# Altium PCB Controller-PCB.PcbDoc
Units mm, origin at the board's own origin, x right, y up, seen from the top; angles counter-clockwise.
Board outline 60 x 40.08 mm, 2 copper layers (Top Layer, Bottom Layer); 4 components, 11 nets, 53 pads, 0 vias.
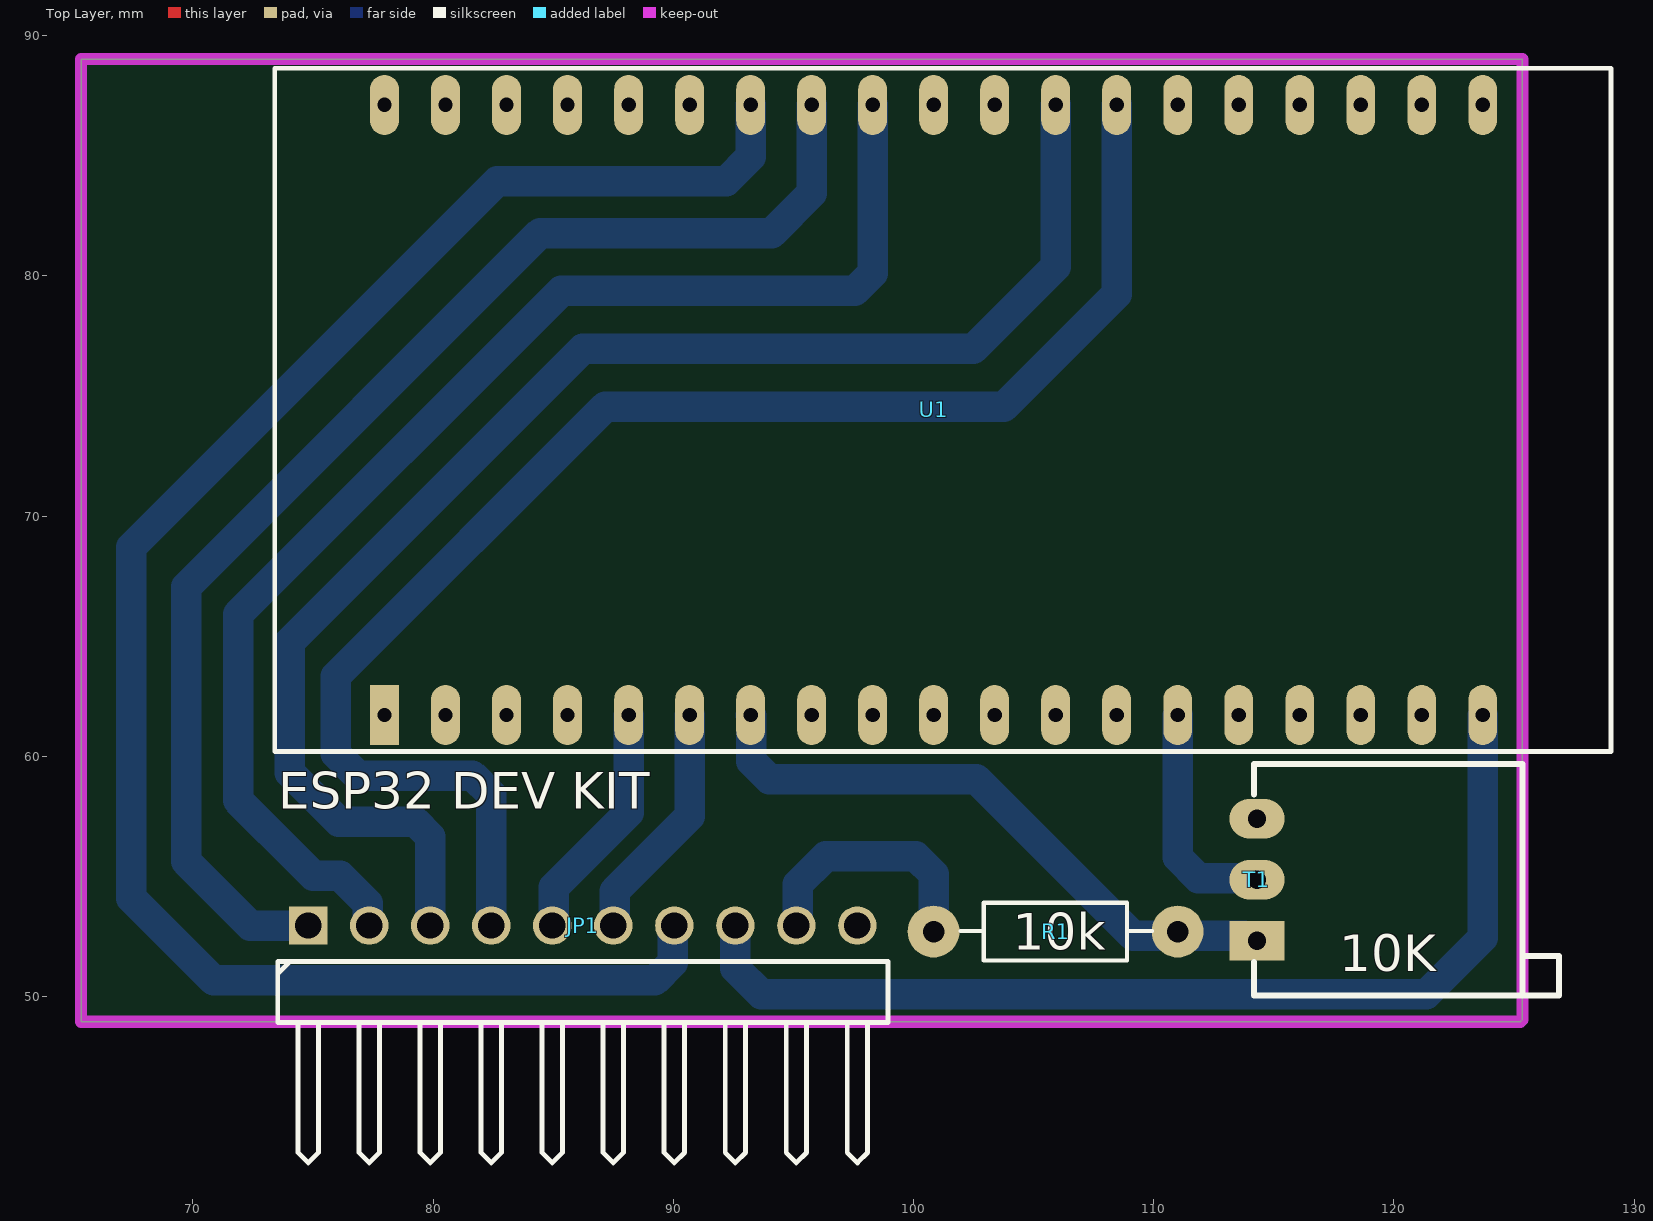
[diagram p0: Top Layer view]
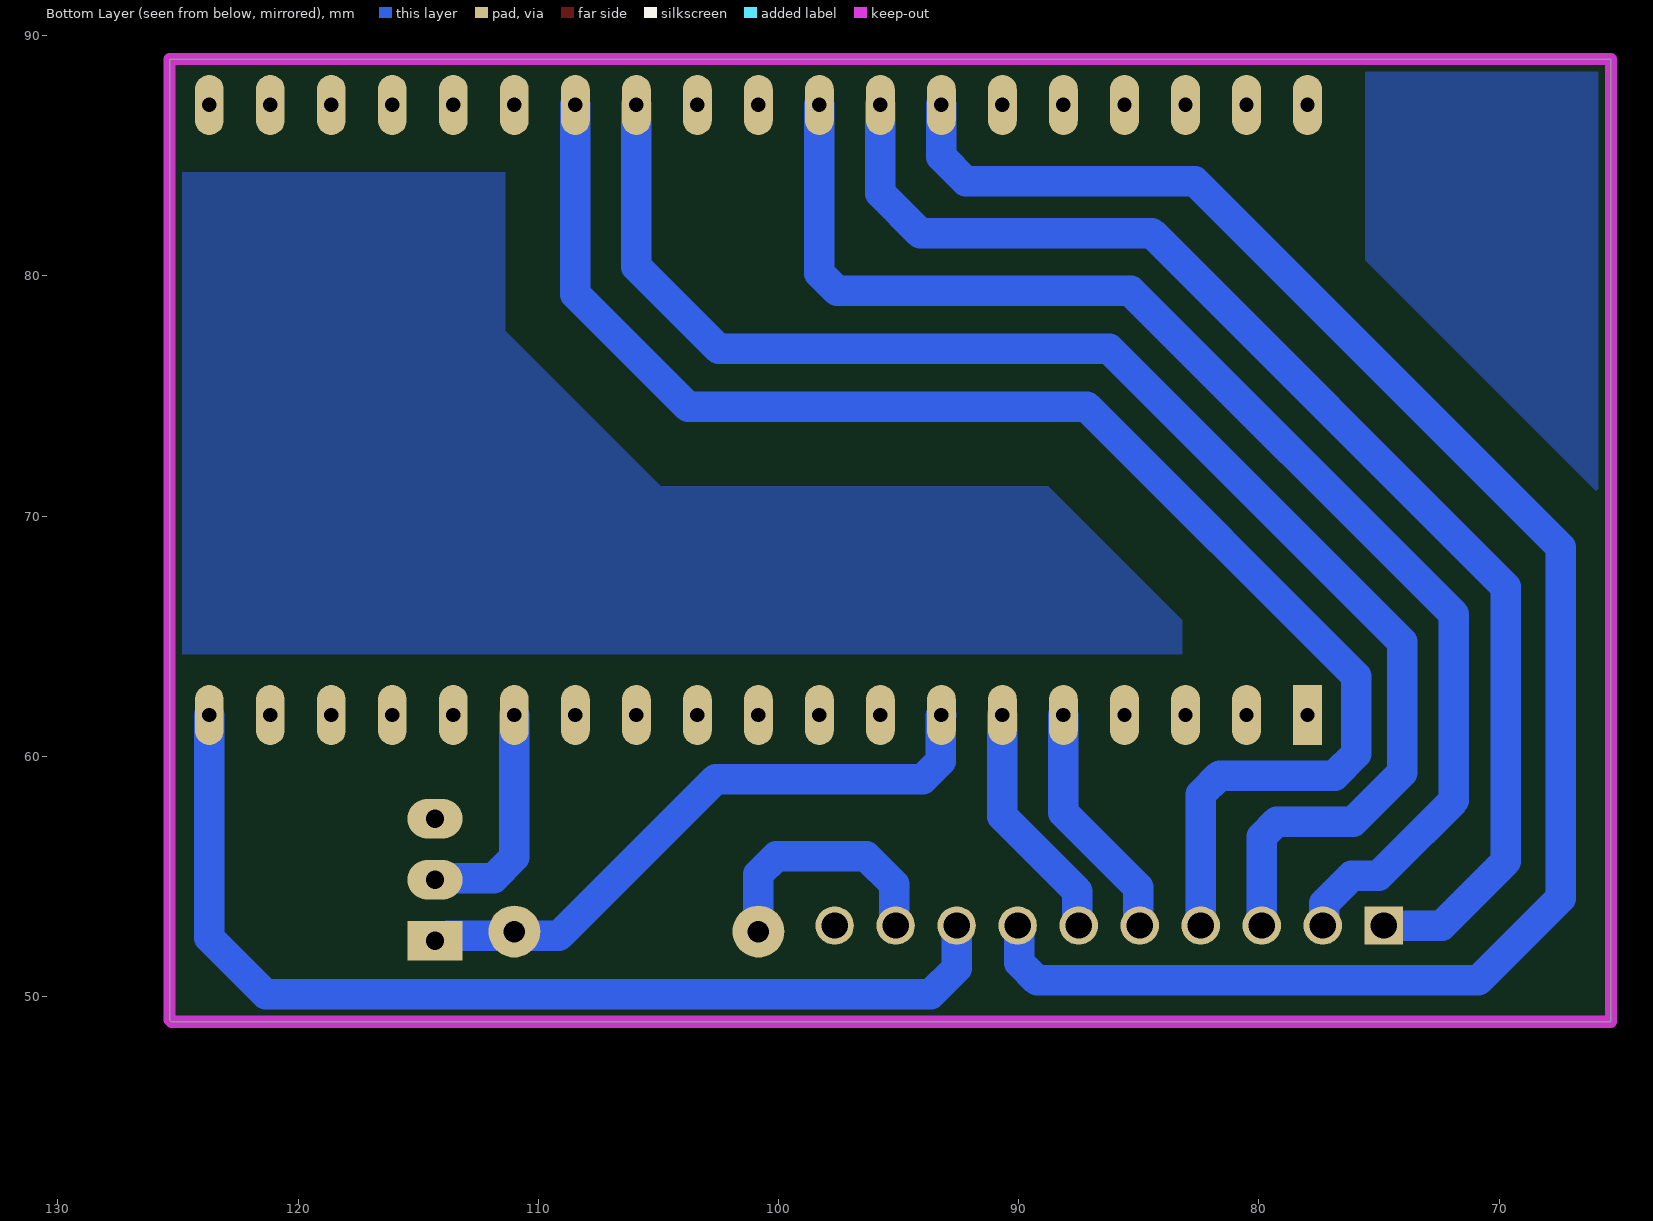
[diagram p1: Bottom Layer view, seen from below]
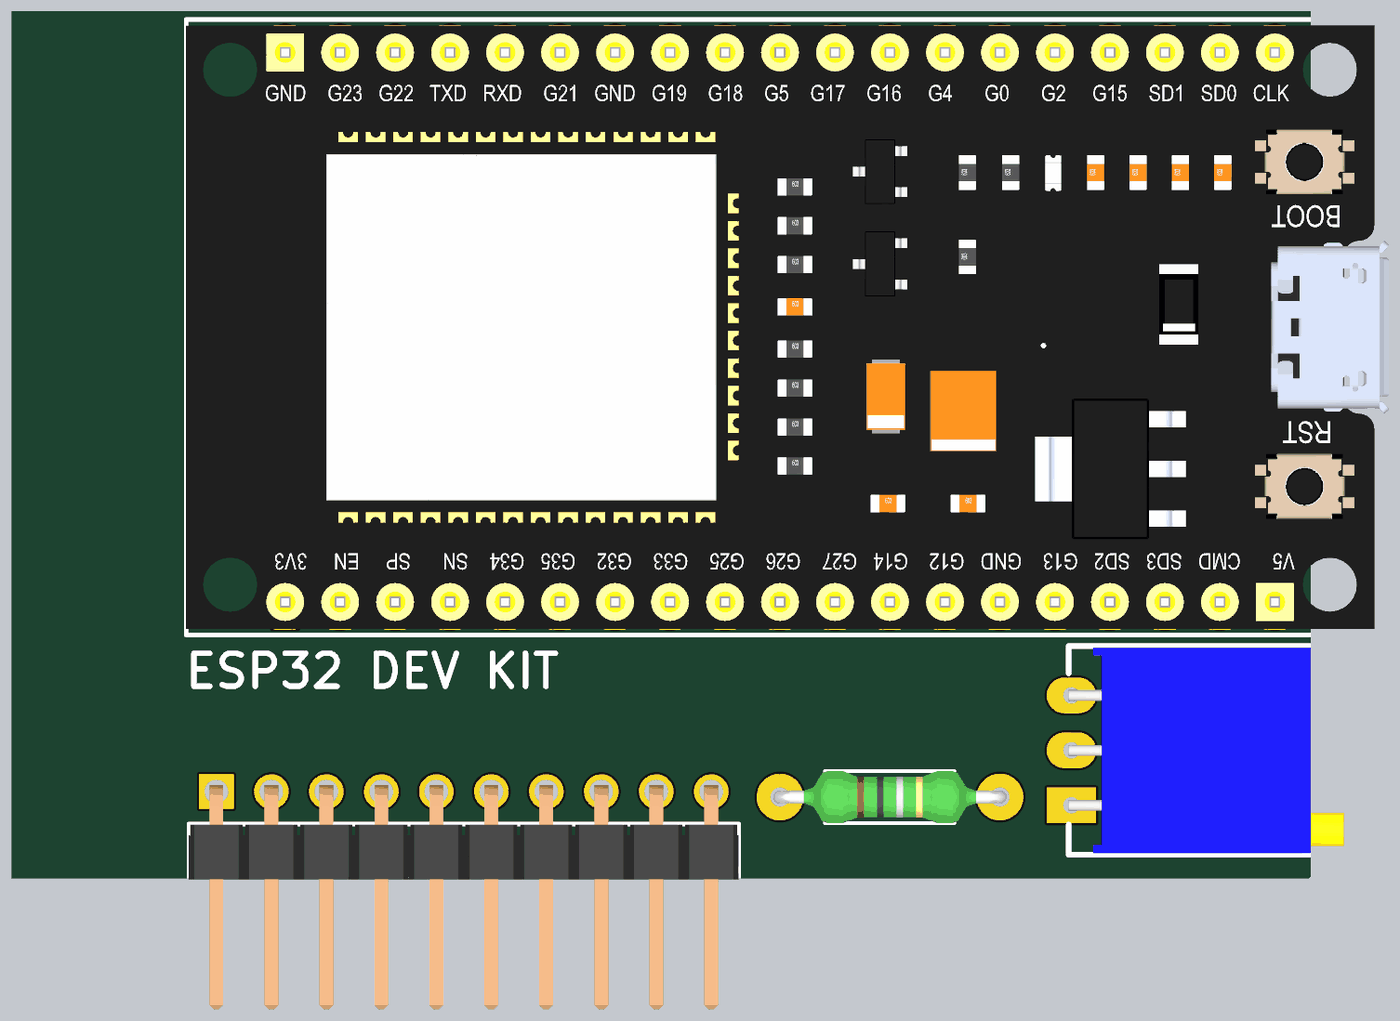
[diagram p2: 3D render of the assembled board from above, using the file's embedded part models]

## Layer stack, top to bottom
Top Solder: solder mask 0.0102, Solder Resist, Dk 3.5
Top Layer: signal copper 0.0356
Dielectric 1: dielectric 0.32, FR-4, Dk 4.8
Bottom Layer: signal copper 0.0356
Bottom Solder: solder mask 0.0102, Solder Resist, Dk 3.5

## Board outline
65.349,48.951 65.349,89.027 125.349,89.027 125.349,49.027 125.273,48.951

## Design rules (kind name [scope] priority, off if disabled: settings)
Clearance Clearance_1 [OnMid vs OnMid] p1: gap=0.635 ignorepadtopadclearanceinfootprint=FALSE sourcerule=39 cellrowname=All cellrowtype=0 cellcolname=All cellcoltype=0 innerlayers=TRUE
Clearance Clearance_2 [(ExistsOnLayer('Top Layer') Or ExistsOnLayer('Bottom Layer')) vs (ExistsOnLayer('Top Layer') Or ExistsOnLayer('Bottom Layer'))] p2: gap=0.635 ignorepadtopadclearanceinfootprint=FALSE sourcerule=39 cellrowname=All cellrowtype=0 cellcolname=All cellcoltype=0 outerlayers=TRUE
Clearance [All] p3: gap=0.254 ignorepadtopadclearanceinfootprint=FALSE ismatrix=TRUE
PolygonConnect [All] p1: connectstyle=Relief reliefconductorwidth=0.254 reliefentries=4 polygonreliefangle="90 Angle" airgapwidth=0.254
RoutingVias [All] p1: holewidth=0.711 width=1.27 viastyle="Through Hole" minholewidth=0.711 minwidth=1.27 maxholewidth=0.711 maxwidth=1.27
SolderMaskExpansion [All] p1: expansion=0.102 istentingtop=FALSE
SupplyNets "Schematic Supply Nets_2" [InNet('GND')] p1: voltage=0.000
SupplyNets "Schematic Supply Nets_1" [InNet('VCC')] p2: voltage=0.000
SupplyNets "Schematic Supply Nets" [InNet('+5')] p3: voltage=0.000
Width [All] p1: maxlimit=2.032 minlimit=1.016 preferedwidth=1.27 minimp=50.000000 maximp=50.000000 favimp=50.000000
30 further rules are at their usual default settings.

## Components (designator, comment, footprint, x,y, rotation, side; value= is the part's Value field where it differs from the comment)
JP1 "JP 1x10 2.54" "JP 1x10 DC" 98.933,50.419 r0 top
R1 "10k" RES-1/4W 105.537,52.832 r180 top
T1 "10K" "BIEN TRO VI CHINH NAM" 114.427,54.864 r90 top
U1 "ESP32 DEV KIT" "ESP32 DEVKIT" 77.978,61.722 r90 top

## Footprints (in the part's own frame and the unit in brackets; to place one, negate y for a bottom-side part, rotate by r counter-clockwise, add the part's x,y. Pads: shape width x height; smd on the part's side, far side on the other; paste and mask are expansions set on the pad)
"BIEN TRO VI CHINH NAM" [mil]
  rect 65x90 hole 30: 1(-100,5)
  oval 65x90 hole 30: 2(0,5) 3(100,5)
  silkscreen extent -190,-490 190,10, body extent -187,-490 188,10, height 226
"ESP32 DEVKIT" [mm]
  rect 2.5x1.2 hole 0.6: 1(0,0)
  oval 2.5x1.2 hole 0.6: 2(0,-2.54) 3(0,-5.08) 4(0,-7.62) 5(0,-10.16) 6(0,-12.7) 7(0,-15.24) 8(0,-17.78) 9(0,-20.32) 10(0,-22.86) 11(0,-25.4) 12(0,-27.94) 13(0,-30.48) 14(0,-33.02) 15(0,-35.56) 16(0,-38.1) 17(0,-40.64) 18(0,-43.18) 19(0,-45.72) 20(25.4,-45.72) 21(25.4,-43.18) 22(25.4,-40.64) 23(25.4,-38.1) 24(25.4,-35.56) 25(25.4,-33.02) 26(25.4,-30.48) 27(25.4,-27.94) 28(25.4,-25.4) 29(25.4,-22.86) 30(25.4,-20.32) 31(25.4,-17.78) 32(25.4,-15.24) 33(25.4,-12.7) 34(25.4,-10.16) 35(25.4,-7.62) 36(25.4,-5.08) 37(25.4,-2.54) 38(25.4,0)
  silkscreen extent -1.52,-51.05 26.92,4.57, body extent -1.27,-50.99 26.67,4.59, height 9.68
"JP 1x10 DC" [mm] "10 pins, 1 row, right angled, gold plating"
  rect 1.6x1.6 hole 1.1: 1(-24.13,2.54)
  round 1.6 hole 1.1: 2(-21.59,2.54) 3(-19.05,2.54) 4(-16.51,2.54) 5(-13.97,2.54) 6(-11.43,2.54) 7(-8.89,2.54) 8(-6.35,2.54) 9(-3.81,2.54) 10(-1.27,2.54)
  silkscreen extent -25.4,-7.34 0,1.04, body extent -25.4,-7.52 0,2.84, height 2.55
RES-1/4W [mil]
  round 85 hole 35: 1(-215,5) 2(185,5)
  silkscreen extent -173,-42 141,52, body extent -227,-42 197,52, height 95

## Part data
JP1: library part "JP 1x10 2.54 Duc Cong", "Cắm", Chung_Loai=Cắm, Don_Vi=Con, Ma_Hang=MH000904, Ten_Linh_Kien="Jump Đơn Đực 2.54MM 1x40P Cong Đứng"
R1: library part Res, "Res", Manufacturer="Generic Components", Class=Passive, Published=08/06/2000, Publisher="Altium Hobart Technology Centre", SubClass=R
T1: library part "Bien Tro Tinh Chinh 10K Nam", "Cắm", Chung_Loai=Cắm, Don_Vi=Con, Ma_Hang=MH003232, Ten_Linh_Kien="Biến Trở VR 103-10K 3296W"

## Nets (pads, with @x,y where several pads share a name; then routed paths per layer and width w, separated by ;. In a path a pad name is that pad's centre, name@x,y a point inside that pad or via, vN(x,y) a via of type N, cw(c..) or ccw(c..) an arc to the next point about the centre after c; other vN are vias at no path point)
+5: JP1.8 U1.19 | length 43.6
  Bottom Layer w1.27: JP1.8 92.583,51.181 93.67,50.094 121.341,50.094 123.698,52.451 U1.19
ADC_voltage: R1.1 T1.1 U1.7 | length 26.3
  Bottom Layer w1.27: U1.7 93.253,61.687 93.253,59.799 93.997,59.055 102.616,59.055 109.142,52.529 110.194,52.529 110.199,52.535 110.828,52.535 R1.1 ; R1.1@110.92,52.783 111.168,52.535 113.772,52.535 113.983,52.324 T1.1
FLOW: JP1.6 U1.6 | length 10.1
  Bottom Layer w1.27: JP1.6 87.566,53.022 87.566,54.392 90.678,57.504 U1.6
GND: JP1.7 U1.32 | length 75.1
  Bottom Layer w1.27: JP1.7 89.98,52.896 89.98,51.417 89.236,50.673 70.866,50.673 67.437,54.102 67.437,68.707 82.677,83.947 92.202,83.947 93.218,84.963 U1.32
NetT1_2: T1.2 U1.14 | length 9.6
  Bottom Layer w1.27: U1.14 110.998,55.798 111.86,54.937 114.227,54.937 T1.2
R1: JP1.1 U1.31 | length 54.1
  Bottom Layer w1.27: JP1.1 72.39,52.959 69.723,55.626 69.723,67.056 84.455,81.788 94.107,81.788 95.758,83.439 U1.31
R2: JP1.2 U1.30 | length 55.2
  Bottom Layer w1.27: JP1.2 77.28,53.022 77.28,53.878 76.129,55.029 75.019,55.029 74.55,55.498 71.882,58.166 71.882,65.913 85.344,79.375 97.554,79.375 98.298,80.119 U1.30
R3: JP1.3 U1.27 | length 61.2
  Bottom Layer w1.27: JP1.3 79.883,56.66 79.266,57.277 76.083,57.277 74.041,59.319 74.041,64.77 86.233,76.962 102.489,76.962 105.918,80.391 U1.27
R4: JP1.4 U1.26 | length 62.8
  Bottom Layer w1.27: JP1.4 82.423,58.42 81.641,59.202 76.852,59.202 75.946,60.108 75.946,63.336 87.159,74.549 103.759,74.549 108.458,79.248 U1.26
VCC: JP1.9 R1.2 | length 10.6
  Bottom Layer w1.27: JP1.9 95.186,53.022 95.186,54.673 96.35,55.837 100.094,55.837 100.838,55.093 R1.2
WL_Signal: JP1.5 U1.5 | length 10.1
  Bottom Layer w1.27: JP1.5 85.026,53.022 85.026,54.546 88.138,57.658 U1.5
pads on no net: JP1.10 T1.3 U1.1 U1.2 U1.3 U1.4 U1.8 U1.9 U1.10 U1.11 U1.12 U1.13 U1.15 U1.16 U1.17 U1.18 U1.20 U1.21 U1.22 U1.23 U1.24 U1.25 U1.28 U1.29 U1.33 U1.34 U1.35 U1.36 U1.37 U1.38

## Polygon pours and split planes (outlines as drawn)
no net on Bottom Layer "NONET_L02_P001" (solid, pour order 1): 111.379,77.724 104.902,71.247 88.773,71.247 83.185,65.659 83.185,64.262 125.476,64.262 125.349,64.389 125.349,84.328 111.379,84.328
no net on Bottom Layer "NONET_L02_P000" (solid, pour order 0): 65.405,89.027 65.532,88.9 75.565,88.9 75.565,85.09 75.565,82.423 75.565,80.645 65.283,70.363

## Keep-outs
Keep-Out Layer:
  lines w0.508: 65.349,88.951 65.349,48.951 125.273,48.951 ; 65.349,89.027 125.349,89.027 125.349,49.027